# Altium PCB AHPR_Sensor_Board.PcbDoc
Units mm, origin at the board's own origin, x right, y up, seen from the top; angles counter-clockwise.
Board outline 50 x 50 mm, 2 copper layers (Top Layer, Bottom Layer), stack 1.601 mm thick; 28 components, 11 nets, 88 pads, 49 vias.
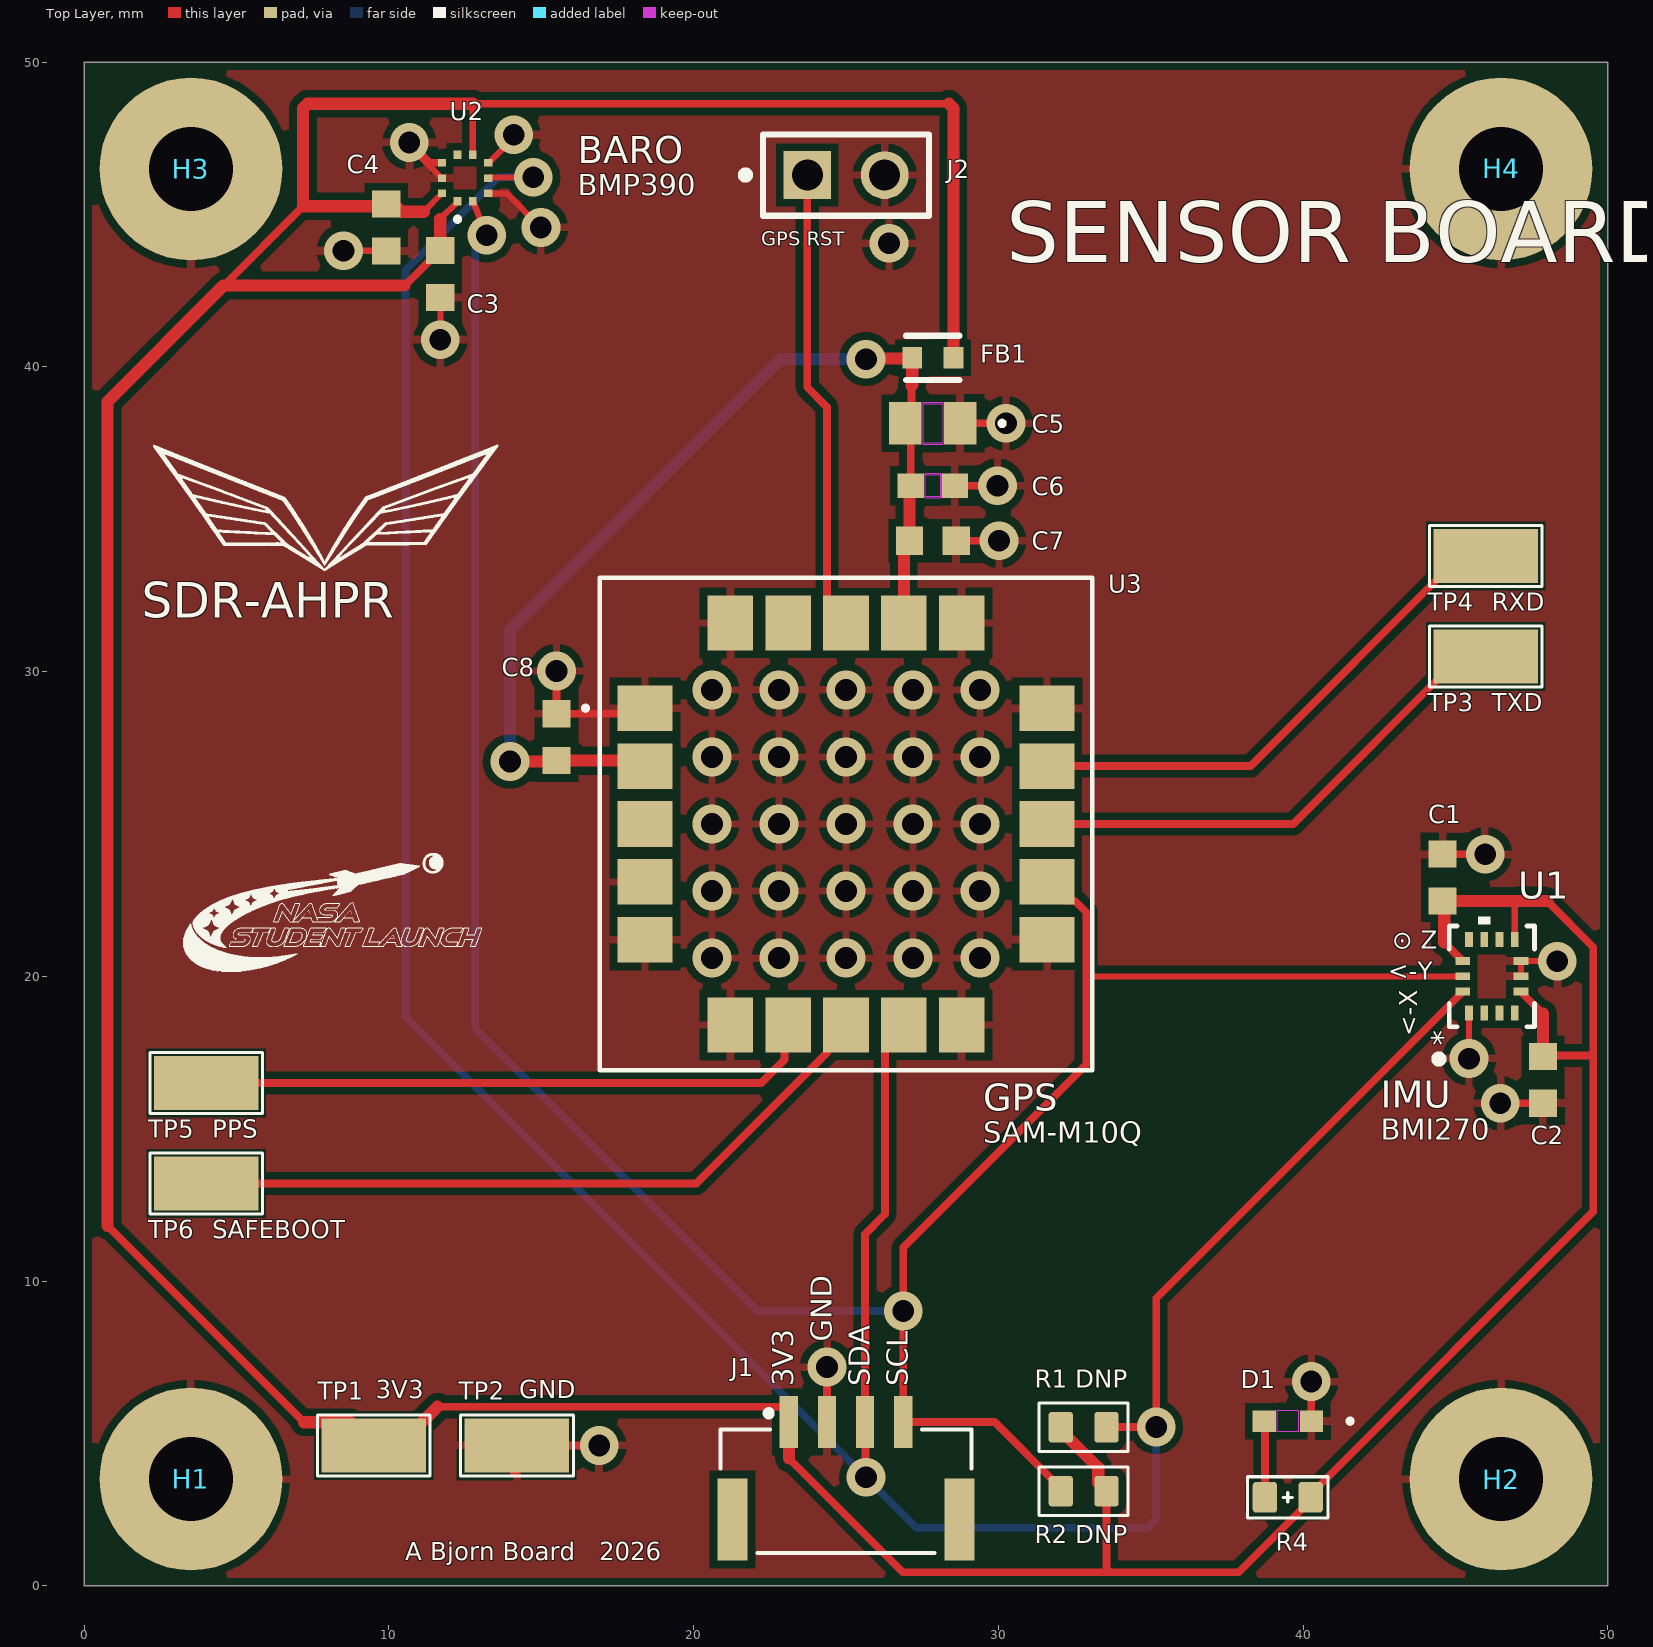
[diagram p0: Top Layer view]
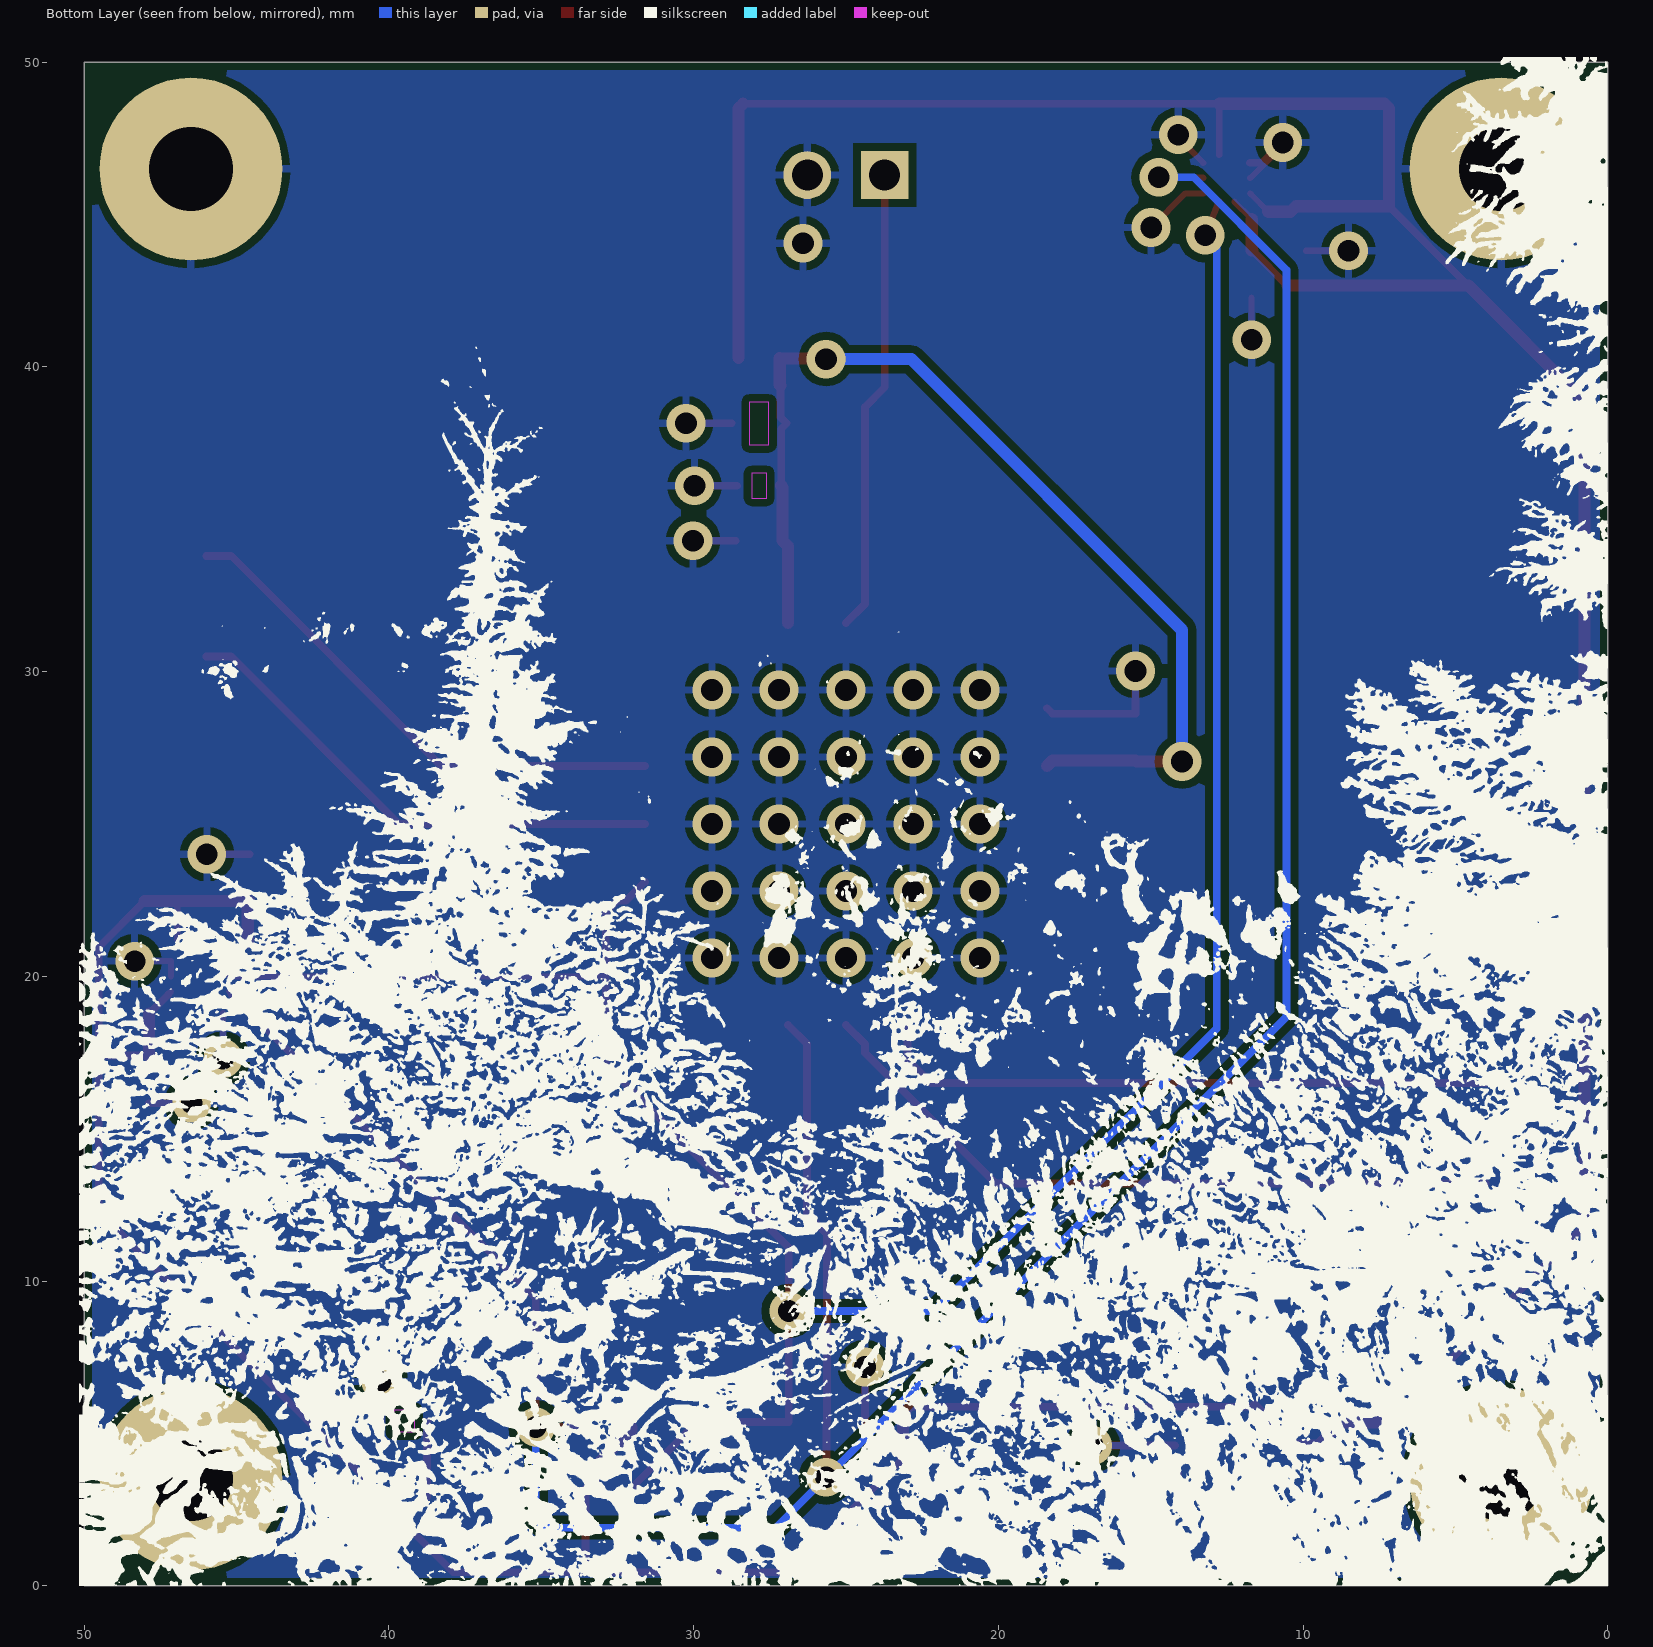
[diagram p1: Bottom Layer view, seen from below]
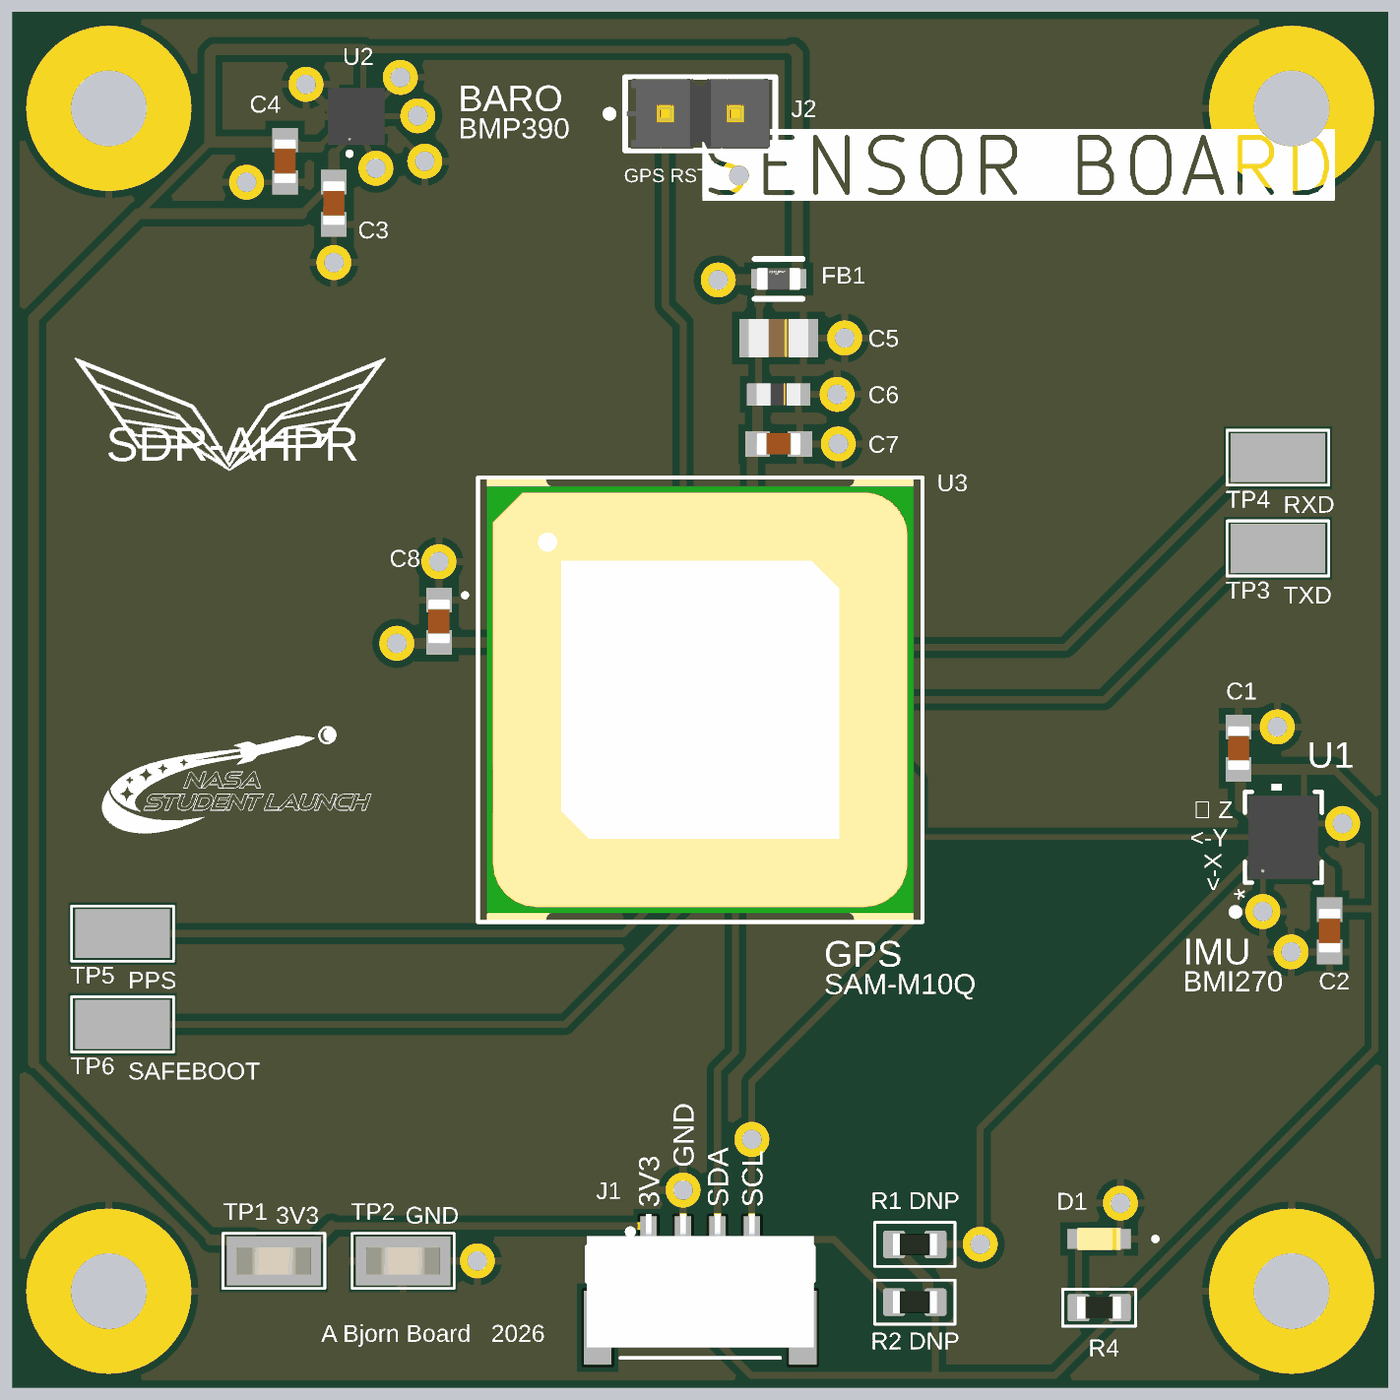
[diagram p2: 3D render of the assembled board from above, using the file's embedded part models]

## Layer stack, top to bottom
Top Solder: solder mask 0.0102, Solder Resist, Dk 3.5
Top Layer: signal copper 0.0356
Dielectric 1: dielectric 1.53, FR-4, Dk 4.8
Bottom Layer: signal copper 0.0356
Bottom Solder: solder mask 0.0102, Solder Resist, Dk 3.5

## Board outline
0,0 50,0 50,50 0,50

## Design rules (kind name [scope] priority, off if disabled: settings)
BoardOutlineClearance [All] p1: gap=0.254 ignorepadtopadclearanceinfootprint=FALSE except(0: Arc-SplitContinuation Track-SplitContinuation SMDPad-SplitContinuation THPad-SplitContinuation Via-SplitContinuation Fill-SplitContinuation Poly-SplitContinuation Region-SplitContinuation Text-SplitContinuation)
Clearance [All] p1: gap=0.254 ignorepadtopadclearanceinfootprint=TRUE
HoleSize [All] p1: absolutevalues=TRUE maxlimit=3 minlimit=0.025 maxpercent=80.000 minpercent=20.000
MinimumSolderMaskSliver [All] p1: minsoldermaskwidth=0.13
PolygonConnect [All] p1: connectstyle=Relief reliefconductorwidth=0.254 reliefentries=4 polygonreliefangle="90 Angle" airgapwidth=0.254
RoutingVias [All] p1: holewidth=0.711 width=1.27 viastyle="Through Hole" minholewidth=0.711 minwidth=1.27 maxholewidth=0.711 maxwidth=1.27
SilkToSilkClearance [All] p1: silktosilkclearance=0.15
SilkToSolderMaskClearance [IsPad] p1: minsilkscreentomaskgap=0.15 clearancetoexposedcopper=TRUE
SolderMaskExpansion SolderMask_ViasTented [IsVia] p1: expansion=-0.65 istentingtop=FALSE // Tent all vias top and bottom
SolderMaskExpansion [All] p2: expansion=0 istentingtop=FALSE
Width [All] p1: maxlimit=0.5 minlimit=0.15 preferedwidth=0.254 minimp=50.000000 maximp=50.000000 favimp=50.000000
26 further rules are at their usual default settings.

## Classes and differential pairs
component class AHPR_Sensor_Board: C1 C2 C3 C4 C5 C6 C7 C8 D1 FB1 J1 J2 "R1 DNP" "R2 DNP" R4 TP1 TP2 TP3 TP4 TP5 TP6 U1 U2 U3

## Components (designator, comment, footprint, x,y, rotation, side; value= is the part's Value field where it differs from the comment)
C1 "100 nF" CAPC1608X90N 44.577,23.241 r270 top
C2 "100 nF" CAPC1608X90N 47.879,16.604 r90 top
C3 "100 nF" CAPC1608X90N 11.684,43.053 r90 top
C4 "100 nF" CAPC1608X90N 9.906,44.577 r90 top
C5 "10 µF" CAP_GRM21_2p15X1p4X1p4_MUR 27.85,38.15 r180 top
C6 "1 µF" G-188_MUR 27.85,36.1 r180 top
C7 "100 nF" CAPC1608X90N 27.85,34.3 r180 top
C8 "100 nF" CAPC1608X90N 15.5,27.85 r270 top
D1 "GREEN" LED_LTST-C191KGKT_LTO 39.5,5.4 r180 top
FB1 "220 Ohm @ 100 MHz, 0.05 Ohm" FP-BLM18-0_15-t0_8-MFG 27.85,40.3 r180 top
H1 "Comment" MH_M2.5_PLATED 3.5,3.5 r0 top
H2 "Comment" MH_M2.5_PLATED 46.5,3.5 r0 top
H3 "Comment" MH_M2.5_PLATED 3.5,46.5 r0 top
H4 "Comment" MH_M2.5_PLATED 46.5,46.5 r0 top
J1 "SM04B-GHS-TB(LF)(SN)" JST_SM04B-GHS-TB 25,3.5 r0 top
J2 "TSW-102-07-G-S" FP-TSW-102-07-G-S-MFG 25,46.3 r0 top
"R1 DNP" "4.7kΩ" RES_0603 32.8,5.2 r180 top
"R2 DNP" "4.7kΩ" RES_0603 32.8,3.1 r0 top
R4 "1 kΩ" RES_0603-Footprint-1 39.5,2.9 r180 top
TP1 "+3V3" 5015 9.5,4.6 r0 top
TP2 "GND" 5015 14.2,4.6 r0 top
TP3 "TXD" 5015 46,30.5 r0 top
TP4 "RXD" 5015 46,33.8 r0 top
TP5 "TIMEPULSE" 5015 4,16.5 r0 top
TP6 "SAFEBOOT_N" 5015 4,13.2 r0 top
U1 "BMI270" BMI270_BOS 46.2,20 r90 top
U2 "BMP390" BMP390 12.5,46.2 r180 top
U3 "SAM-M10Q-00B" SAM-M10Q_UBL 25,25 r0 top

## Footprints (in the part's own frame and the unit in brackets; to place one, negate y for a bottom-side part, rotate by r counter-clockwise, add the part's x,y. Pads: shape width x height; smd on the part's side, far side on the other; paste and mask are expansions set on the pad)
5015 [mm]
  rect 3.43x1.78 smd: 1(0,0)
  silkscreen extent -1.85,-1 1.85,1, body extent -1.35,-0.5 1.35,0.5, height 1.51
BMI270_BOS [mil]
  rect 19x10 smd paste+0 mask+0: 1(-47.5,29.53) 2(-47.5,9.84) 3(-47.5,-9.84) 4(-47.5,-29.53) 8(47.5,-29.53) 9(47.5,-9.84) 10(47.5,9.84) 11(47.5,29.53)
  rect 10x19 smd paste+0 mask+0: 5(-19.69,-37.5) 6(0,-37.5) 7(19.68,-37.5) 12(19.68,37.5) 13(0,37.5) 14(-19.69,37.5)
  silkscreen extent -65,-55 77,55, body extent -60,-50 60,50, height 34
BMP390 [mm]
  rect 0.25x0.275 smd: 1(0.25,0.763) 2(-0.25,0.763) 6(-0.25,-0.763) 7(0.25,-0.763)
  rect 0.275x0.25 smd: 3(-0.762,0.5) 4(-0.762,0) 5(-0.762,-0.5) 8(0.762,-0.5) 9(0.762,0) 10(0.762,0.5)
  body extent -1.03,-1.03 1.03,1.03, height 0.81
CAP_GRM21_2p15X1p4X1p4_MUR [mil]
  rect 42x55 smd paste+0 mask+0: 1(-35.5,0) 2(35.5,0)
  Top Layer keep-out region: -12.5,-25.5 -12.5,25.5 12.5,25.5 12.5,-25.5
  Keep-Out Layer region: -12.5,-27.5 -12.5,27.5 12.5,27.5 12.5,-27.5
  silkscreen extent -92,-3 -87,3, body extent -43,-27 43,27, height 55
CAPC1608X90N [mm]
  rect 0.89x0.93 smd: 1(-0.77,0) 2(0.77,0)
  body extent -0.8,-0.4 0.8,0.4, height 0.9
FP-BLM18-0_15-t0_8-MFG [mm]
  rect 0.65x0.7 smd paste+0 mask+0: 1(-0.675,0) 2(0.675,0)
  silkscreen extent -0.87,-0.72 0.87,0.72, body extent -1.1,-0.58 1.1,0.58, height 0.25
FP-TSW-102-07-G-S-MFG [mm]
  rect 1.57x1.57 hole 1.02 paste-2539.97 mask+0: 1(-1.27,0)
  round 1.57 hole 1.02 paste-2539.97 mask+0: 2(1.27,0)
  silkscreen extent -3.42,-1.34 2.73,1.34, body extent -2.83,-1.44 2.83,1.44, height 0.25
G-188_MUR [mil]
  rect 34x32 smd paste+0 mask+0: 1(-28.5,0) 2(28.5,0)
  Top Layer keep-out region: -9.5,-14 -9.5,14 9.5,14 9.5,-14
  Keep-Out Layer region: -9.5,-16 -9.5,16 9.5,16 9.5,-16
  body extent -31,-16 31,16, height 35
JST_SM04B-GHS-TB [mm]
  rect 0.6x1.7 smd paste+0 mask+0.102: 1(-1.875,1.875) 2(-0.625,1.875) 3(0.625,1.875) 4(1.875,1.875)
  rect 1x2.7 smd paste+0 mask+0.102: MP1(-3.725,-1.325) MP2(3.725,-1.325)
  silkscreen extent -4.13,-2.42 4.13,2.26, body extent -4.13,-2.05 4.13,2.8, height 4.25
LED_LTST-C191KGKT_LTO [mil]
  rect 30x28 smd paste+0 mask+0: 1(-30.5,0) 2(30.5,0)
  Top Layer keep-out region: -13.5,-14 -13.5,14 13.5,14 13.5,-14
  Keep-Out Layer region: -13.5,-14 -13.5,14 13.5,14 13.5,-14
  silkscreen extent -84,-3 -78,3, body extent -31,-16 31,16, height 22
MH_M2.5_PLATED [mm]
  round 6 hole 2.75: 1(0,0)
RES_0603 [mm]
  rrect25% 0.8x1 smd: 1(-0.75,0) 2(0.75,0)
  silkscreen extent -1.46,-0.8 1.46,0.8, body extent -0.8,-0.4 0.8,0.4, height 0.45
RES_0603-Footprint-1 [mm]
  rrect25% 0.8x1 smd: 1(-0.75,0) 2(0.75,0)
  silkscreen extent -1.33,-0.67 1.33,0.67, body extent -0.8,-0.4 0.8,0.4, height 0.45
SAM-M10Q_UBL [mil]
  rect 71x59 smd paste+0 mask+0: 1(-259.84,149.61) 2(-259.84,74.8) 3(-259.84,0) 4(-259.84,-74.8) 5(-259.84,-149.61) 11(259.84,-149.61) 12(259.84,-74.8) 13(259.84,0) 14(259.84,74.8) 15(259.84,149.61)
  rect 59x71 smd paste+0 mask+0: 6(-149.61,-259.84) 7(-74.8,-259.84) 8(0,-259.84) 9(74.8,-259.84) 10(149.61,-259.84) 16(149.61,259.84) 17(74.8,259.84) 18(0,259.84) 19(-74.8,259.84) 20(-149.61,259.84)
  silkscreen extent -318,-318 318,318, body extent -305,-315 305,315, height 268

## Part data
C1 C2 C3 C4 C7: library part CMP-001-00119-1, "Capacitor SMD 0402 - 3V3, 100 nF", Manufacturer_Part_Number=GRM188R71H104KA93D, Design Item ID=CAP_0402, Source=Generic_Schematic_Library.SchLib
C5: library part CMP-001-00119-1, "Capacitor SMD 0402 - 3V3, 1 µF", Manufacturer_Part_Number=GRM21BR71A106KA73L, Design Item ID=CAP_0402, Source=Generic_Schematic_Library.SchLib
C6: library part CMP-001-00119-1, "Capacitor SMD 0402 - 3V3, 1 µF", Manufacturer_Part_Number=GRM188R71A105KA61D, Design Item ID=CAP_0402, Source=Generic_Schematic_Library.SchLib
C8: library part CMP-001-00119-1, "Capacitor SMD 0402 - 3V3, 1 µF", Manufacturer_Part_Number=GRM188R71H104KA93D, Design Item ID=CAP_0402, Source=Generic_Schematic_Library.SchLib
D1: library part LTST-C191KGKT, "LED, green, 0603, low profile (LTST-C191KGKT)", Manufacturer_Name=LITE-ON, Copyright="Copyright (C) 2025 Ultra Librarian. All rights reserved.", Manufacturer_Part_Number=LTST-C191KGKT
FB1: library part CMP-0686-00436-3, "Chip ferrite bead, 220 Ohm @ 100 MHz, 0.05 Ohm DCR, 0603", Case Code (Imperial)=0603, Case Code (Metric)=1608, Current Rating=500mA, DC Resistance (DCR)=380mR, Frequency=100MHz, Manufacturer_Part_Number=BLM18KG601SN1D, Max Operating Temperature=125°C, Min Operating Temperature=-55°C, Package Quantity=1, Tolerance=25%, Case/Package=0603, Core Material=Ferrite, DC Current=500mA, Depth=0.8mm, Height=0.8mm, Impedance=600R, Lead Free="Lead Free", Length=1.6mm, Material=Steel, Max Current Rating=500mA, Max DC Current=500mA, Military Standard=Not, Number of Circuits=1, Number of Lines=1, Number of Pins=2, Packaging="Tape and Reel", Radiation Hardening=No, REACH SVHC="No SVHC", RoHS Compliant=Yes, Shielding=Unshielded, Termination=SMD/SMT, Test Frequency=100MHz, Weight=7.1E-05oz, Width=0.8mm
J1: library part SM04B-GHS-TB, Manufacturer_Part_Number=BM04B-GHS-TBT(LF)(SN)
"R1 DNP" "R2 DNP": library part CMP-009-00225-1, "Resistor SMD 0603 - 4.7kΩ", Manufacturer Part Number=RC0603FR-074K7L, Design Item ID=RES_0603, Source=Generic_Schematic_Library.SchLib
R4: library part CMP-009-00014-9, "Chip Resistor, 1 KOhm, +/-1%, 0.1 W, -55 to 155 degC, 0603 (1608 Metric)", Case/Package=0603, Manufacturer_Part_Number=RC0603FR-071KL, Max Operating Temperature=155°C, Min Operating Temperature=-55°C, Power=100mW, Tolerance=1%, Voltage Rating=50V, Mounting Technology=SM, Pins=2, RoHS Compliant=True
TP1 TP2 TP3 TP4 TP5 TP6: library part 5015, "Conn Test Point 1 POS Solder ST SMD 1 Port T/R / 5015", Manufacturer_Name="Keystone Electronics", Mouser Part Number=534-5015, Arrow Part Number=5015, Arrow Price/Stock=https://www.arrow.com/en/products/5015/keystone-electronics.html?utm_currency=USD&region=europe, Datasheet Link=http://www.keyelco.com/product-pdf.cfm?p=1353, Geometry.Height=1.52mm, Manufacturer_Part_Number=5015, Mouser Price/Stock=https://www.mouser.co.uk/ProductDetail/Keystone-Electronics/5015?qs=qOqV1E1P08ShW56PtUq2FA%3D%3D
U1: "Description", Manufacturer_Name="Bosch Sensortec", Copyright="Copyright (C) 2025 Ultra Librarian. All rights reserved.", Manufacturer_Part_Number=BMI270, RefDes=RefDes, Type=Type
U2: "Board Mount Pressure Sensors", Manufacturer_Name=BOSCH, Mouser Part Number=262-BMP390, Arrow Part Number=BMP390, Arrow Price/Stock=https://www.arrow.com/en/products/bmp390/bosch-sensortec.html?utm_currency=USD&region=nac, Datasheet Link=https://www.bosch-sensortec.com/media/boschsensortec/downloads/datasheets/bst-bmp390-ds002.pdf, Geometry.Height=0.8mm, Manufacturer_Part_Number=BMP390, Mouser Price/Stock=https://www.mouser.co.uk/ProductDetail/Bosch-Sensortec/BMP390?qs=QNEnbhJQKvYQVfvRMgo2YA%3D%3D
U3: library part SAM-M10Q, Manufacturer_Part_Number=SAM-M10Q-00B
J2: Manufacturer_Part_Number=TSW-102-07-G-S

## Via types
v1: diameter 1.27, hole 0.711, Top Layer to Bottom Layer, 49 vias

## Nets (pads, with @x,y where several pads share a name; then routed paths per layer and width w, separated by ;. In a path a pad name is that pad's centre, name@x,y a point inside that pad or via, vN(x,y) a via of type N, cw(c..) or ccw(c..) an arc to the next point about the centre after c; other vN are vias at no path point)
+3V3: "R1 DNP.2" "R2 DNP.2" C1.2 C2.2 C3.2 C4.2 FB1.1 J1.1 R4.1 TP1.1 U1.5 U1.8 U1.12 U2.1 U2.6 U2.10 | length 172.8
  Top Layer w0.2: 11.137,45.099 11.7,45.662 11.7,45.675 11.726,45.7 U2.10 ; 11.684,44.858 12.25,45.424 U2.1 ; U2.6 12.75,48.641 ; U1.12@45.171,20.576 U1.12 ; U1.8 46.95,22.431 ; U1.5 U1.5@47.229,19.424
  Top Layer w0.254: 0.762,11.811 7.21,5.363 ; 4.572,42.672 7.175,45.276 ; 10.513,42.672 C3.2@11.664,43.823 ; 11.596,5.871 J1.1@22.952,5.871 ; 12.75,48.641 28.376,48.641 ; 23.125,4.18 26.861,0.444 33.655,0.444 ; 33.55,3.1 33.55,0.549 33.655,0.444 ; R4.1@40.25,2.8 37.894,0.444 33.655,0.444 ; R4.1@40.25,3 49.53,12.28 49.53,17.399 ; 44.636,21.113 45.165,20.584 45.171,20.584 U1.12@45.171,20.576 ; U1.5@47.229,19.424 47.229,19.416 47.235,19.416 47.879,18.772 ; C2.2@47.904,17.399 49.53,17.399 ; 48.014,22.471 49.53,20.955 49.53,17.399
  Top Layer w0.4: 0.762,11.811 0.762,38.862 4.572,42.672 10.513,42.672 ; 7.21,5.363 8.737,5.363 TP1.1 10.325,4.6 11.596,5.871 ; 11.144,45.093 10.414,45.093 10.232,45.276 7.175,45.276 7.175,48.492 7.324,48.641 12.75,48.641 ; C3.2@11.664,43.823 C3.2 11.684,44.858 ; J1.1@22.952,5.871 23.125,5.698 J1.1 23.125,4.18 ; 28.376,48.641 28.525,48.492 FB1.1 ; 32.05,5.2 32.05,5.1 33.277,3.873 33.277,3.373 33.55,3.1 ; R4.1@40.25,2.8 R4.1 R4.1@40.25,3 ; 44.636,21.113 44.636,22.411 C1.2 46.99,22.471 ; 46.95,22.431 46.99,22.471 ; 47.879,18.772 C2.2 C2.2@47.904,17.399 ; 48.014,22.471 46.99,22.471
+3V3_GPS: C5.2 C6.2 C7.2 C8.2 FB1.2 U3.2 U3.17 | length 34.7
  Top Layer w0.254: C6.2 27.126,37.972 C5.2 27.152,38.353 27.152,39.387
  Top Layer w0.4: v1(13.97,27.051) 15.471,27.051 C8.2 18.22,27.08 U3.2 ; v1(25.654,40.259) 25.675,40.28 27.154,40.28 FB1.2 27.175,39.411 27.152,39.387 ; U3.17 26.9,34.12 C7.2 ; C7.2@27.07,34.29 C7.2 ; C6.2 27.08,36.054 C7.2
  Bottom Layer w0.4: v1(13.97,27.051) 13.97,31.369 22.86,40.259 v1(25.654,40.259)
GND: C1.1 C2.1 C3.1 C4.1 C5.1 C6.1 C7.1 C8.1 D1.1 H1.1 H2.1 H3.1 H4.1 J1.2 J2.2 TP2.1 U1.1 U1.6 U1.7 U2.3 U2.5 U2.8 U2.9 U3.1 U3.4 U3.5 U3.6 U3.10 U3.11 U3.15 U3.16 U3.20 | length 30.9
  Top Layer w0.2: v1(8.509,43.815) 9.898,43.815 C4.1 ; v1(10.668,47.371) 10.668,47.258 11.726,46.2 U2.9 ; v1(11.684,40.894) C3.1 ; U2.3 13.863,45.7 v1(14.986,44.577) ; U2.5 13.274,46.7 14.097,47.522 v1(14.097,47.625) ; v1(45.45,17.3) U1.1 ; U1.6 U1.7 v1(48.35,20.5)
  Top Layer w0.254: v1(10.668,47.371) 11.339,46.7 U2.8 ; 14.097,3.683 TP2.1@14.558,4.144 ; TP2.1 v1(16.9,4.6) ; v1(15.5,30.02) C8.1 18.22,28.62 U3.1 ; J1.2@24.375,4.825 J1.2 v1(24.375,7.175) ; C6.1 v1(29.974,36.1) ; C7.1 v1(30.02,34.3) ; C5.1 v1(30.252,38.15) ; D1.1 v1(40.275,6.7) ; C1.1 v1(45.977,24.011) ; v1(46.479,15.834) C2.1
  other v1: 20.6,20.6 22.8,20.6 25,20.6 27.2,20.6 29.4,20.6 20.6,22.8 22.8,22.8 25,22.8 27.2,22.8 29.4,22.8 20.6,25 22.8,25 25,25 27.2,25 29.4,25 20.6,27.2 22.8,27.2 25,27.2 27.2,27.2 29.4,27.2 20.6,29.4 22.8,29.4 25,29.4 27.2,29.4 29.4,29.4 26.41,44.059
GPS_RESET_N: J2.1 U3.18 | length 15.2
  Top Layer w0.254: J2.1 23.73,39.332 24.378,38.684 24.378,32.222 U3.18
GPS_RXD: TP4.1 U3.14 | length 17.3
  Top Layer w0.254: U3.14 38.275,26.9 45.175,33.8 TP4.1
GPS_SAFEBOOT_N: TP6.1 U3.8 | length 23.3
  Top Layer w0.254: TP6.1 20.09,13.2 24.378,17.488 24.378,17.778 U3.8
GPS_TIMEPULSE: TP5.1 U3.7 | length 20.5
  Top Layer w0.254: TP5.1 22.215,16.5 22.981,17.266 22.981,18.281 U3.7
GPS_TXD: TP3.1 U3.13 | length 16.7
  Top Layer w0.254: U3.13 39.675,25 45.175,30.5 TP3.1
I2C_SCL: "R2 DNP.1" J1.4 U1.13 U2.2 U3.12 | length 84.8
  Top Layer w0.2: U2.2 12.775,45.399 v1(13.208,44.323) ; 32.883,20.066 32.949,20 U1.13
  Top Layer w0.254: U3.12 32.222,22.478 32.512,22.478 32.883,22.107 32.883,20.066 32.883,17.106 26.875,11.099 J1.4 29.875,5.375 32.05,3.2 32.05,3.1
  Bottom Layer w0.254: v1(13.208,44.323) 12.827,43.942 12.827,18.288 22.098,9.017 v1(26.875,9.017)
I2C_SDA: "R1 DNP.1" J1.3 U1.14 U2.4 U3.9 | length 101.7
  Top Layer w0.2: U2.4 13.276,46.214 14.718,46.214 v1(14.733,46.229) ; U1.14@45.171,19.424 U1.14
  Top Layer w0.254: v1(25.654,3.556) 25.639,3.571 25.639,5.361 J1.3 25.625,11.535 26.278,12.188 26.278,17.778 U3.9 ; 33.55,5.2 33.557,5.207 v1(35.179,5.207) 35.179,9.43 45.165,19.416 45.171,19.416 U1.14@45.171,19.424
  Bottom Layer w0.254: v1(14.733,46.229) 13.589,46.228 10.541,43.18 10.541,18.669 v1(25.654,3.556) 27.305,1.905 34.903,1.905 35.179,2.181 v1(35.179,5.207)
NetD1_2: D1.2 R4.2 | length 2.5
  Top Layer w0.254: D1.2 38.75,5.375 R4.2
pads on no net: J1.MP1 J1.MP2 U1.2 U1.3 U1.4 U1.9 U1.10 U1.11 U2.7 U3.3 U3.19

## Polygon pours and split planes (outlines as drawn)
GND on Top Layer "GND_L01_P001" (solid, remove dead copper, pour order 0): 0,0 50,0 50,50 0,50
GND on Bottom Layer "GND_L02_P000" (solid, remove dead copper, pour order 1): 0,0 50,0 50,50 0,50

## Silkscreen, mask and mechanical layers (free items; w line width, h text height)
Top Overlay:
  drawing of 17 lines, arcs and shapes, not listed
  text "BARO" at 16.2,46.4 h1.52
  text "BMP390" at 16.2,45.411 h1.2
  text "GPS RST" at 22.225,43.815 h0.8
  text "SENSOR BOARD" at 30.256,43.434 h2
  text "RXD" at 46.2,31.8 h1
  text "SDR-AHPR" at 1.879,31.369 h2
  text "TXD" at 46.2,28.5 h1
  text "⊙ Z" at 42.926,20.701 h1
  text "<-Y" at 42.799,19.685 h1
  text "<-X" at 43.942,18.034 h1 r90
  text "IMU" at 42.545,15.384 h1.52
  text "GPS" at 29.5,15.3 h1.52
  text "PPS" at 4.2,14.5 h1
  text "BMI270" at 42.545,14.401 h1.2
  text "SAM-M10Q" at 29.5,14.301 h1.2
  text "SAFEBOOT" at 4.2,11.2 h1
  text "GND" at 24.758,8 h1.2 r90
  text "3V3" at 23.503,6.55 h1.2 r90
  text "SDA" at 26.008,6.55 h1.2 r90
  text "SCL" at 27.258,6.55 h1.2 r90
  text "3V3" at 9.573,5.956 h1
  text "GND" at 14.273,5.956 h1
  text "A Bjorn Board   2026" at 10.541,0.635 h1
Bottom Overlay:
  drawing of 928 lines, arcs and shapes, not listed

## Text inside footprints (layer, text, board x,y; h text height)
U1: Mechanical 13 "*" at 45.835,18.717 h1.27 r90; Top Overlay "*" at 45.184,17.714 h1.27 r90
U3: Mechanical 13 "*" at 19.619,28.165 h1.27